# Altium PCB 24V-70A-Power-Board-v2.0.PcbDoc (part 9 of 9)
Units mm, origin at the board's own origin, x right, y up, seen from the top; angles counter-clockwise.
Board outline 350 x 215 mm, 2 copper layers (Top Layer, Bottom Layer), stack 1.64 mm thick; 337 components, 182 nets, 856 pads, 561 vias.
Unrouted connection lines stored in the file: 58.
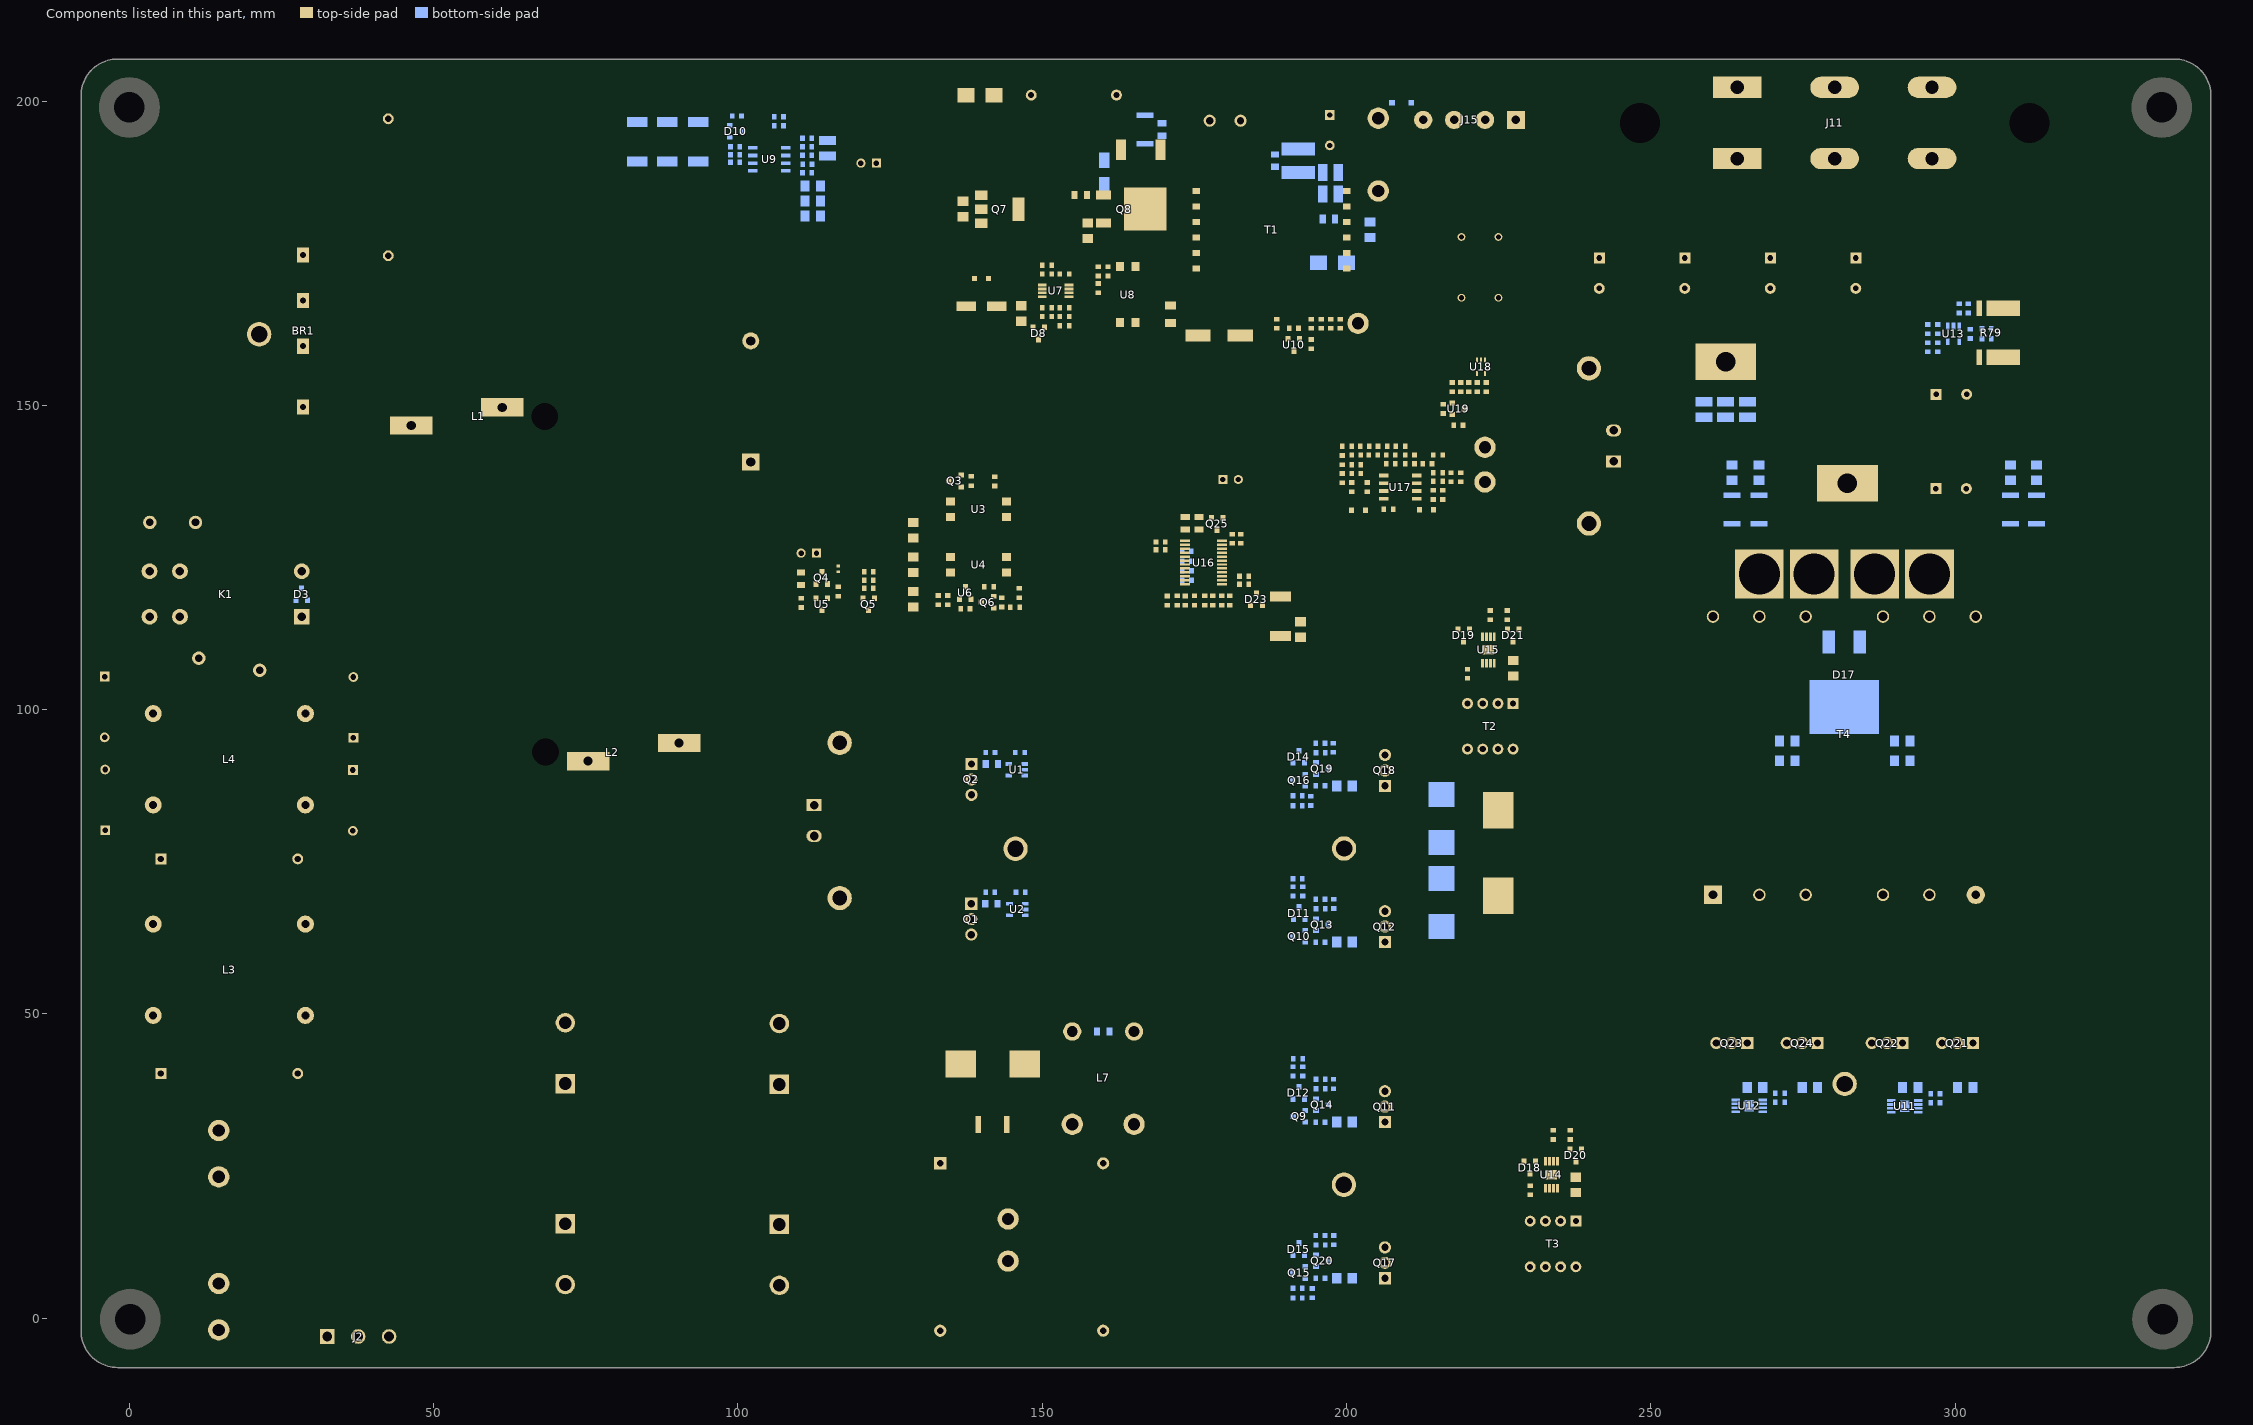
[diagram p4: the components of this part, seen from the top]

## Polygon pours and split planes (outlines as drawn) (continued)
GND on Bottom Layer "GND_L02_P068" (solid, pour order 68): 180.365,201.501 cw(c181.074,201.501) 181.074,202.209 185.748,202.209 cw(c185.762,201.358) 186.614,201.371 186.614,177.876 cw(c185.42,177.876) 185.42,176.682 ccw(c185.42,175.819) 184.556,175.819 184.556,171.247 ccw(c186.334,171.247) 186.334,169.469 220.015,169.469 cw(c220.015,168.427) 221.056,168.427 221.056,167.157 cw(c220.04,167.157) 220.04,166.141 191.694,166.141 ccw(c191.694,163.601) 189.154,163.601 189.154,158.953 cw(c187.173,158.953) 187.173,156.972 179.527,156.972 cw(c179.527,158.521) 177.978,158.521 177.978,159.029 ccw(c175.438,159.029) 175.438,161.569 166.141,161.569 ccw(c166.141,159.029) 163.601,159.029 163.601,111.455 ccw(c166.141,111.455) 166.141,108.915 185.725,108.915 cw(c185.725,106.375) 188.265,106.375 188.265,2.896 ccw(c189.459,2.896) 189.459,1.702 191.182,1.702 ccw(c191.182,2.88) 192.361,2.88 192.361,3.769 cw(c192.681,3.769) 192.681,4.089 208.509,4.089 ccw(c208.509,4.953) 209.372,4.953 209.372,9.347 ccw(c208.197,9.347) 208.197,10.522 201.077,10.522 cw(c201.077,11.396) 200.203,11.396 200.203,12.074 ccw(c199.123,12.074) 199.123,13.154 196.1,13.154 196.1,14.043 219.604,14.043 cw(c219.604,11.503) 222.144,11.503 222.144,8.748 ccw(c224.684,8.748) 224.684,6.208 230.308,6.208 ccw(c230.308,7.04) 231.14,7.04 231.14,9.601 cw(c231.788,9.601) 231.788,10.249 233.326,10.249 cw(c233.326,9.022) 234.553,9.022 234.553,-4.826 cw(c232.013,-4.826) 232.013,-7.366 162.941,-7.366 cw(c162.941,-4.826) 160.401,-4.826 160.401,22.2 170.764,22.2 ccw(c170.764,24.74) 173.304,24.74 173.304,48.819 ccw(c170.764,48.819) 170.764,51.359 145.796,51.359 cw(c145.796,53.238) 143.916,53.238 143.916,62.078 153.543,62.078 ccw(c153.543,64.618) 156.083,64.618 156.083,151.308 ccw(c153.543,151.308) 153.543,153.848 122.326,153.848 cw(c122.326,156.388) 119.786,156.388 119.786,183.769 cw(c121.818,183.769) 121.818,185.801 122.936,185.801 ccw(c122.936,188.341) 125.476,188.341 125.476,199.263 155.457,199.263 cw(c155.457,197.664) 157.056,197.664 157.056,176.809 ccw(c157.767,176.809) 157.767,176.098 171.12,176.098 ccw(c171.12,177.038) 172.06,177.038 172.06,188.798 cw(c173.025,188.798) 173.025,189.763 179.654,189.763 ccw(c179.654,190.475) 180.365,190.475
NetD17_1 on Bottom Layer "NETD17_1_L02_P067" (solid, pour order 67): 264.89,46.958 ccw(c264.89,46.417) 264.349,46.417 264.349,40.909 cw(c263.371,40.912) 263.368,39.935 cw(c263.245,41.182) 263.245,39.929 257.404,39.929 cw(c257.404,41.32) 256.012,41.32 256.012,57.794 ccw(c254.241,57.794) 254.241,59.565 246.075,59.565 236.88,59.565 cw(c236.88,62.105) 234.34,62.105 234.34,124.333 cw(c235.861,124.336) 235.858,125.857 243.205,125.857 ccw(c243.205,127.254) 244.602,127.254 244.602,132.014 cw(c246.541,132.014) 246.541,133.953 269.316,133.953 cw(c269.316,131.413) 271.856,131.413 271.856,117.526 ccw(c273.177,117.526) 273.177,116.205 280.035,116.205 cw(c280.035,115.037) 281.203,115.037 281.203,108.941 cw(c279.984,108.941) 279.984,107.721 270.329,107.721 ccw(c270.329,106.379) 268.986,106.379 268.986,89.535 ccw(c271.526,89.535) 271.526,86.995 279.628,86.995 cw(c279.628,85.725) 280.898,85.725 280.898,56.876 280.898,49.784 cw(c278.358,49.784) 278.358,47.244 276.86,47.244 ccw(c276.86,46.482) 276.098,46.482 276.098,40.818 cw(c275.387,40.818) 275.387,40.107 269.164,40.107 cw(c269.164,41.351) 267.919,41.351 267.919,46.431 ccw(c267.392,46.431) 267.392,46.958
NetD13_1 on Bottom Layer "NETD13_1_L02_P061" (solid, pour order 61): 218.948,68.25 218.948,29.337 cw(c217.703,29.337) 217.703,28.092 209.931,28.092 cw(c209.931,29.362) 208.661,29.362 208.661,32.693 ccw(c207.609,32.693) 207.609,33.745 204.8,33.745 204.8,35.777 208.294,35.777 ccw(c208.294,36.932) 209.448,36.932 209.448,62.179 ccw(c208.407,62.179) 208.407,63.221 204.699,63.221 204.699,65.43 208.407,65.43 ccw(c208.407,66.472) 209.448,66.472 209.448,68.25
GND on Bottom Layer "GND_L02_P057" (solid, pour order 57): 134.854,141.72 ccw(c132.938,141.72) 132.938,143.637 121.26,143.637 ccw(c121.234,141.351) 118.948,141.376 118.948,129.794 ccw(c121.437,129.794) 121.437,127.305 133.829,127.305 cw(c133.829,125.091) 136.042,125.091 136.042,112.42 cw(c133.502,112.42) 133.502,109.88 113.132,109.88 ccw(c113.132,107.34) 110.592,107.34 110.592,91.059 ccw(c112.293,91.059) 112.293,89.357 119.075,89.357 ccw(c119.075,91.237) 120.955,91.237 120.955,93.548 cw(c122.301,93.548) 122.301,94.894 141.732,94.894 141.732,92.523 145.21,92.523 145.21,89.838 142.382,89.838 ccw(c142.382,89.188) 141.732,89.188 141.732,87.788 cw(c141.092,87.788) 141.092,87.148 138.38,87.148 ccw(c138.379,85.75) 136.982,85.75 136.982,72.492 ccw(c138.481,72.492) 138.481,70.993 141.301,70.993 cw(c141.301,70.45) 141.844,70.45 141.844,69.561 144.609,69.561 cw(c144.609,68.675) 145.496,68.675 145.496,67.755 cw(c144.617,67.755) 144.617,66.876 142.138,66.876 ccw(c142.138,66.201) 141.463,66.201 141.463,64.872 cw(c140.637,64.872) 140.637,64.046 83.82,64.046 70.752,64.046 ccw(c70.752,58.979) 65.684,58.979 65.684,-3.023 ccw(c70.028,-3.023) 70.028,-7.366 75.87,-7.366 163.728,-7.366 ccw(c163.728,-4.826) 166.268,-4.826 166.268,19.685 ccw(c163.728,19.685) 163.728,22.225 148.666,22.225 cw(c148.666,24.765) 146.126,24.765 146.126,66.335 cw(c146.667,66.335) 146.667,66.876 147.767,66.876 147.767,67.476 146.667,67.476 cw(c146.667,67.688) 146.455,67.688 146.455,74.141 cw(c148.488,74.141) 148.488,76.175 ccw(c148.488,77.648) 149.962,77.648 149.962,86.309 ccw(c148.387,86.309) 148.387,87.884 147.108,87.884 cw(c147.108,88.639) 146.353,88.639 146.353,89.626 cw(c146.565,89.626) 146.565,89.838 147.665,89.838 147.665,90.438 146.565,90.438 cw(c146.565,90.904) 146.099,90.904 146.099,136.119 ccw(c144.249,136.119) 144.249,137.968 136.207,137.968 cw(c136.207,139.321) 134.854,139.321
NetD2_2 on Bottom Layer "NETD2_2_L02_P040" (solid, pour order 40): 140.274,65.023 cw(c139.804,65.023) 139.804,64.554 127.318,64.554 cw(c127.318,65.989) 125.882,65.989 125.882,71.044 ccw(c123.901,71.044) 123.901,73.025 118.974,73.025 86.538,73.025 cw(c86.538,75.565) 83.998,75.565 83.998,99.39 cw(c86.157,99.39) 86.157,101.549 94.107,101.549 cw(c94.107,99.009) 96.647,99.009 96.647,84.226 ccw(c99.187,84.226) 99.187,81.686 115.418,81.686 123.825,81.686 ccw(c123.825,84.226) 126.365,84.226 126.365,88.036 cw(c127.901,88.036) 127.901,89.573 139.812,89.573 cw(c139.812,88.659) 140.726,88.659 140.726,88.25 cw(c139.992,88.25) 139.992,87.516 137.755,87.516 ccw(c137.755,83.949) 134.188,83.949 134.188,69.556 ccw(c137.126,69.556) 137.126,66.618 139.857,66.618 cw(c139.857,66.201) 140.274,66.201
GND on Bottom Layer "GND_L02_P039" (solid, pour order 39): 80.504,168.06 ccw(c82.626,168.06) 82.626,165.938 101.118,165.938 ccw(c101.118,168.478) 103.658,168.478 103.658,181.941 103.658,188.442 ccw(c103.256,188.442) 103.256,188.844 101.814,188.844 99.815,188.844 cw(c99.815,189.337) 99.322,189.337 99.322,194.242 ccw(c98.873,194.242) 98.873,194.691 97.648,194.691 ccw(c97.648,194.071) 97.028,194.071 97.028,192.831 cw(c96.283,192.831) 96.283,192.086 82.296,192.086 ccw(c82.296,190.294) 80.504,190.294
ISENSE_FB on Bottom Layer "NONET_L-01_P-001" (solid, pour order 18): 99.605,199.609 ccw(c98.216,199.609) 98.216,200.998 17.678,200.998 ccw(c17.678,198.458) 15.138,198.458 15.138,195.021 15.138,175.555 ccw(c18.059,175.555) 18.059,172.634 29.283,172.634 ccw(c29.283,175.174) 31.823,175.174 31.823,176.932 31.823,178.562 cw(c34.363,178.562) 34.363,181.102 54.356,181.102 76.622,181.102 ccw(c76.622,183.642) 79.162,183.642 79.162,190.475 cw(c81.702,190.475) 81.702,193.015 95.758,193.015 ccw(c95.758,193.777) 96.52,193.777 96.52,197.028 99.605,197.028
NetC7_1 on Bottom Layer "NETC7_1_L02_P033" (solid, pour order 33): 13.233,59.207 13.233,53.01 19.406,53.01 19.406,40.475 19.406,23.089 cw(c16.866,23.089) 16.866,20.549 -4.47,20.549 cw(c-4.47,23.089) -7.01,23.089 -7.01,56.667 cw(c-4.47,56.667) -4.47,59.207
AC_N on Bottom Layer "NONET_L-01_P-001" (solid, pour order 34): 55.474,19.157 55.474,56.667 ccw(c52.934,56.667) 52.934,59.207 28.778,59.207 ccw(c28.778,56.667) 26.238,56.667 26.238,26.111 ccw(c28.778,26.111) 28.778,23.571 37.176,23.571 cw(c37.176,21.031) 39.716,21.031 39.716,-5.439 ccw(c41.643,-5.439) 41.643,-7.366 53.594,-7.366 ccw(c53.594,-5.486) 55.474,-5.486 55.474,-3.596
EARTH on Bottom Layer "NONET_L-01_P-001" (solid, pour order 14): 33.553,19.38 cw(c33.553,16.84) 36.093,16.84 36.093,11.43 36.093,-4.597 38.84,-4.597 38.84,22.2 24.511,22.2 24.511,58.877 18.922,58.877 18.922,87.087 cw(c20.532,87.087) 20.532,88.697 38.903,88.697 ccw(c38.904,90.538) 40.745,90.538 40.745,94.539 ccw(c38.84,94.539) 38.84,96.444 -5.567,96.444 ccw(c-5.567,94.623) -7.388,94.623 -7.388,90.404 ccw(c-5.681,90.404) -5.681,88.697 3.346,88.697 14.08,88.697 cw(c14.08,86.376) 16.401,86.376 16.401,73.481 16.401,55.702 21.187,55.702 21.187,19.38
AC_L on Bottom Layer "NONET_L-01_P-001" (solid, pour order 3): 14.691,18.201 32.258,18.201 cw(c32.258,15.661) 34.798,15.661 34.798,-4.826 cw(c32.258,-4.826) 32.258,-7.366 19.615,-7.366 10.185,-7.366 cw(c10.185,-4.826) 7.645,-4.826 7.645,5.131 ccw(c5.105,5.131) 5.105,7.671 -4.47,7.671 cw(c-4.47,10.211) -7.01,10.211 -7.01,15.661 cw(c-4.47,15.661) -4.47,18.201
NetL9_1 on Bottom Layer "NONET_L-01_P-001" (solid, pour order 26): 272.856,141.665 cw(c274.447,141.665) 274.447,143.256 289.179,143.256 cw(c289.225,141.686) 290.796,141.732 290.796,117.412 272.856,117.412
NetC1_2 on Bottom Layer "NONET_L-01_P-001" (solid, pour order 13): 23.622,86.3 ccw(c23.622,83.76) 21.082,83.76 21.082,65.143 ccw(c23.622,65.143) 23.622,62.603 40.172,62.603 ccw(c40.179,64.71) 42.287,64.71 42.287,83.506 ccw(c39.493,83.506) 39.493,86.3
NetC8_1 on Bottom Layer "NONET_L-01_P-001" (solid, pour order 12): 11.913,86.3 cw(c11.913,83.125) 15.088,83.125 15.088,65.143 cw(c12.548,65.143) 12.548,62.603 0.864,62.603 -4.903,62.603 cw(c-4.903,64.71) -7.01,64.71 -7.01,83.506 cw(c-4.216,83.506) -4.216,86.3

## Other copper
Top Layer:
  rectangle net EARTH: 260.22,188.818 268.22,204.018
  rectangle net GND-S: 223.208,115.751 228.446,116.795
  rectangle net GND-S: 227.932,112.624 230.734,113.847
  rectangle net GND-S: 218.979,111.967 220.624,112.59
  rectangle net GND-S: 219.804,111.967 220.624,113.676
  rectangle net GND-S: 220.743,109.034 225.933,110.604
  rectangle net GND-S: 238.229,27.308 240.182,32.385
  rectangle net GND-S: 233.567,30.521 240.182,32.385
  rectangle net GND-S: 231.102,22.783 236.291,24.353
  rectangle net GND-S: 231.122,23.043 232.131,26.228
  rectangle net GND-S: 230.666,25.308 232.131,26.228
  rectangle net NetC73_2: 236.347,136.982 253.086,141.783
  rectangle net NetC73_2: 244.856,102.337 253.086,141.783
  rectangle net NetC73_2: 244.856,102.337 301.466,105.766
  rectangle net NetL9_1: 263.856,128.143 290.796,140.716
  rectangle net NetL9_1: 272.856,117.145 290.796,140.716
  rectangle net NetD13_2: 244.678,47.828 254,72.898
  rectangle net NetD13_2: 244.678,60.579 261.894,72.898
  rectangle net NetD13_2: 217.246,47.828 231.242,74.309
  rectangle net NetR91_2: 216.726,136.977 219.256,137.815
  rectangle net NetR90_2: 215.43,138.514 217.719,139.403
  rectangle net I_out: 198.869,135.641 199.758,137.668
  region net +3V45: 224.702,153.391 224.702,155.688 222.529,155.688 222.529,153.391
  region net +5Vref: 217.919,149.598 217.919,152.629 215.427,152.629 215.427,149.598
  region net NetR114_1: 218.005,146.332 218.005,149.062 215.427,149.062 215.427,146.332
  rectangle net NetC96_1: 200.393,132.366 201.238,136.241
  rectangle net NetC96_2: 201.93,136.911 203.835,137.719
  rectangle net GND-S: 207.295,132.499 208.42,133.731
  rectangle net GND-S: 210.764,138.181 212.909,142.358
  rectangle net GND-S: 207.658,132.499 208.42,142.298
  rectangle net NetC87_1: 213.881,132.379 214.706,134.984
  rectangle net NetC87_1: 210.764,134.163 216.268,134.971
  rectangle net NetC90_1: 215.379,135.687 216.268,137.955
  rectangle net NetC87_2: 213.671,135.641 214.801,142.358
  rectangle net NetC87_2: 210.764,135.641 214.801,136.449
  rectangle net NetC95_2: 209.264,136.911 212.314,137.511
  rectangle net NetC95_2: 209.264,136.911 210.026,143.726
  rectangle net NetR106_1: 206.208,142.837 208.502,143.726
  rectangle net NetC102_2: 204.775,138.181 206.896,142.298
  rectangle net NetC102_2: 204.775,141.409 206.896,142.298
  rectangle net NetR106_2: 203.388,142.837 205.597,143.726
  rectangle net NetR116_1: 201.981,141.409 204.013,142.298
  rectangle net NetR116_2: 200.457,141.409 201.219,143.726
  rectangle net +5Vref: 201.864,142.837 202.626,143.726
  rectangle net NetR111_2: 198.856,138.366 199.745,140.703
  rectangle net NetR111_2: 198.856,139.814 201.219,140.703
  rectangle net NetC97_2: 200.393,136.957 201.282,139.256
  rectangle net NetC96_2: 201.93,136.911 202.743,140.703
  rectangle net NetC96_2: 201.93,136.911 206.914,137.511
  rectangle net NetC96_1: 200.393,135.433 203.835,136.241
  rectangle net NetC96_1: 200.393,135.641 206.914,136.241
  rectangle net GND-S: 176.562,127.992 181.674,128.624
  rectangle net GND-S: 176.562,122.238 178.047,128.624
  rectangle net NetD5_1: 197.079,170.236 198.514,178.74
  rectangle net NetJ9_1: 200.21,161.59 203.71,165.502
  rectangle net NetD7_2: 150.886,162.272 153.28,163.652
  rectangle net NetD7_2: 149.958,162.272 153.28,163.295
  rectangle net NetC22_2: 146.431,160.363 150.778,161.891
  rectangle net NetC22_2: 145.567,160.363 147.454,164.91
  rectangle net NetC22_2: 145.567,163.674 150.406,164.91
  rectangle net NetC22_2: 149.542,163.674 150.406,165.059
  rectangle net NetC41_2: 208.656,7.874 213.728,10.167
  rectangle net NetC40_2: 208.67,88.969 213.741,91.262
  region net GND: 154.965,175.168 154.131,176.002 152.4,174.271 153.234,173.437
  rectangle net GND: 152.4,171.158 153.28,174.271
  rectangle net GND: 154.127,174.338 166.319,176.002
  rectangle net GND: 156.591,174.338 158.369,178.198
  rectangle net GND-S: 178.711,127.648 180.361,128.473
  rectangle net GND-S: 178.709,127.992 181.674,128.624
  rectangle net GND-S: 180.785,128.473 181.674,130.438
  rectangle net GND-S: 191.567,113.707 193.345,122.357
  rectangle net GND-S: 184.974,120.169 193.345,122.357
  rectangle net GND-S: 183.562,121.468 191.16,122.357
  rectangle net GND-S: 166.929,125.818 169.071,126.707
  rectangle net GND-S: 177.559,115.367 179.981,117.559
  rectangle net GND-S: 173.047,115.367 175.468,117.554
  rectangle net VCC_FB: 180.785,126.949 183.054,127.711
  rectangle net NetC93_2: 172.666,125.813 174.316,126.463
  rectangle net VREF: 172.729,127.608 174.253,130.147
  rectangle net NetR10_1: 145.895,116.109 148.123,117.396
  rectangle net GND-S: 130.861,121.864 133.635,126.205
  rectangle net VCC_Primary: 139.908,137.968 141.084,149.365
  rectangle net NetQ3_1: 136.207,136.227 138.763,137.206
  rectangle net VCC_Primary: 136.207,137.968 141.084,139.37
  rectangle net GND-S: 172.666,131.067 178.198,133.848
  rectangle net NetC13_2: 121.886,117.807 122.855,123.11
  rectangle net PFC_ON: 115.945,123.377 117.012,126.252
  rectangle net VCC_PFC: 132.537,140.056 139.04,147.777
  rectangle net VCC_PFC: 131.953,137.177 135.323,147.777
  rectangle net GND: 139.946,119.725 140.96,121.469
  rectangle net GND: 132.499,119.725 137.869,121.469
  rectangle net GND: 132.499,118.389 134.918,121.234
  rectangle net GND-S: 132.279,124.463 135.703,126.205
  rectangle net NetQ6_3: 139.557,116.109 140.96,118.106
  rectangle net NetQ6_3: 137.706,116.109 140.477,116.998
  rectangle net NetC15_2: 135.703,116.121 137.173,118.645
  rectangle net VCC_Primary: 141.557,117.95 142.398,120.655
  rectangle net NetQ6_1: 141.557,116.109 145.158,117.315
  rectangle net VCC_Primary: 141.557,117.95 154.28,119.056
  rectangle net NetR10_1: 143.403,121.923 146.67,123.223
  rectangle net NetR10_1: 145.723,119.55 148.051,123.223
  rectangle net NetC15_2: 127.914,116.121 137.173,117.645
  rectangle net NetR18_1: 127.914,118.661 129.692,123.313
  rectangle net NetR15_1: 127.914,124.329 129.692,128.981
  rectangle net +390V: 102.972,129.997 129.692,131.521
  rectangle net NetD5_1: 197.079,176.479 205.105,178.74
  region net NetD5_1: 205.105,178.74 202.893,178.74 202.893,170.236 205.105,170.236
  rectangle net NetD5_1: 197.079,170.236 205.105,173.894
  rectangle net GND: 149.298,169.01 153.28,169.314
  rectangle net GND: 151.167,164.17 153.28,172.047
  rectangle net GND-S: 189.814,154.105 195.91,159.791
  rectangle net NetC30_1: 188.074,163.801 194.628,165.502
  rectangle net NetJ9_1: 195.411,163.801 203.71,165.502
  rectangle net NetC26_2: 191.745,160.448 196.342,163.103
  rectangle net NetQ8_1: 156.591,183.687 161.309,185.465
  rectangle net NetQ8_3: 156.591,179.087 161.309,180.865
  rectangle net NetC21_2: 136.117,179.182 140.981,180.682
  rectangle net NetC21_2: 136.117,179.182 137.895,181.68
  rectangle net NetQ7_1: 136.117,182.784 137.895,185.282
  rectangle net NetQ7_1: 136.117,183.782 140.981,185.282
  rectangle net GND-S: 119.04,117.807 121.124,118.894
  rectangle net GND-S: 109.738,115.868 116.923,117.345
  rectangle net GND-S: 120.135,117.868 121.124,121.742
  rectangle net VCC_FB: 116.034,119.802 118.643,121.126
  rectangle net INRUSH_RLY: 112.163,122.031 121.124,123.111
  rectangle net INRUSH_RLY: 112.163,122.031 113.663,126.48
  rectangle net VCC_FB: 109.738,122.031 111.008,126.464
  rectangle net VCC_FB: 116.034,119.802 116.923,121.126
  rectangle net VCC_FB: 114.332,120.206 116.923,121.126
  rectangle net NetQ4_1: 114.332,117.868 116.923,119.04
  rectangle net NetC14_2: 109.738,117.868 111.008,121.015
  rectangle net NetC14_2: 109.84,117.868 113.252,118.788
  rectangle net NetQ4_1: 114.332,117.868 115.152,119.802
  rectangle net NetQ4_1: 112.432,119.148 115.152,119.802
  rectangle net NetQ4_1: 112.432,119.289 113.252,121.126
  rectangle net NetD3_1: 119.527,114.554 123.444,116.788
  pour cut-out: 323.723,57.402 323.723,59.36 ccw(c321.183,59.36) 321.183,61.9 302.641,61.9 cw(c302.641,63.094) 301.447,63.094 301.447,62.158 ccw(c303.788,62.158) 303.788,59.817 321.308,59.817 cw(c321.308,57.402)
  pour cut-out: 301.447,75.59 cw(c303.987,75.59) 303.987,78.13 337.109,78.13 cw(c337.109,75.59) 339.649,75.59 339.649,74.422 ccw(c337.464,74.422) 337.464,76.606 303.987,76.606 ccw(c303.987,74.066) 301.447,74.066 301.447,73.33
  pour cut-out: 321.183,59.817 cw(c321.183,57.277) 323.723,57.277 323.723,28.042 cw(c321.183,28.042) 321.183,25.502 317.678,25.502 ccw(c317.678,27.686) 319.862,27.686 319.862,57.511 ccw(c317.556,57.511) 317.556,59.817
  pour cut-out: 225.969,94.941 227.699,94.941 cw(c227.699,93.523) 229.118,93.523 229.118,91.372 cw(c228.518,91.372) 228.518,90.773 226.836,90.773 cw(c226.836,91.665) 225.944,91.665 225.944,94.835
  pour cut-out: 236.271,9.881 236.271,8.151 ccw(c237.689,8.151) 237.689,6.732 239.84,6.732 ccw(c239.84,7.332) 240.439,7.332 240.439,9.014 ccw(c239.547,9.014) 239.547,9.906 236.377,9.906
  pour cut-out: 204.814,63.111 207.811,63.111 207.811,60.393 204.814,60.393
  pour cut-out: 204.8,33.528 207.797,33.528 207.797,30.81 204.8,30.81
  pour cut-out: 124.771,192.069 124.771,187.751 118.192,187.751 118.192,192.069
Bottom Layer:
  rectangle net GND-S: 271.63,35.039 273.621,38.805
  rectangle net GND-S: 297.157,34.946 299.118,38.805
  rectangle net EARTH: 253.949,188.818 268.22,205.957
  region net NetC73_2: 283.083,106.156 270.135,106.156 270.135,102.54 283.083,102.54
  rectangle net NetC73_2: 282.651,102.54 293.624,106.156
  rectangle net GND-S: 269.95,88.341 271.91,99.568
  rectangle net GND-S: 291.414,88.341 293.373,99.72
  rectangle net GND-S: 290.939,32.791 292.509,36.451
  rectangle net GND-S: 265.412,32.884 266.982,36.544
  rectangle net NetD13_2: 222.123,48.387 253.136,56.134
  rectangle net NetC37_2: 216.332,172.771 227.432,182.651
  region net NetC71_2: 307.718,138.495 307.718,134.829 310.518,134.829 310.518,138.495
  region net NetC72_2: 311.973,138.495 311.973,134.829 314.773,134.829 314.773,138.495
  region net NetC78_2: 266.385,138.495 266.385,134.871 269.185,134.871 269.185,138.495
  region net NetC77_2: 261.94,138.495 261.94,134.829 264.74,134.829 264.74,138.495
  rectangle net NetD13_2: 220.103,48.387 230.759,81.441
  rectangle net NetC73_2: 272.926,88.341 290.833,106.156
  rectangle net VCC_FB: 183.972,128.829 187.376,153.06
  rectangle net VCC_FB: 182.761,128.829 185.471,136.423
  rectangle net VCC_FB: 176.911,134.417 185.471,136.423
  rectangle net VCC_FB: 177.749,148.107 186.487,153.06
  rectangle net VCC_FB: 187.63,190.739 194.996,202.182
  rectangle net NetD25_2: 210.169,195.222 214.274,200.167
  rectangle net NetC17_2: 197.481,179.153 204.876,182.709
  rectangle net VCC_FB: 187.63,195.222 207.969,202.182
  rectangle net NetD13_2: 209.448,68.885 230.759,81.441
  rectangle net GND: 208.61,82.677 218.059,95.352
  rectangle net GND: 200.203,91.568 218.059,95.352
  rectangle net GND: 208.61,82.677 223.672,91.673
  rectangle net GND: 221.132,82.677 223.672,94.844
  rectangle net NetC17_1: 187.579,170.312 196.901,189.804
  rectangle net NetC17_1: 185.953,170.307 195.275,175.539
  rectangle net GND-S: 166.294,128.829 182.228,134.001
  rectangle net GND-S: 166.294,115.214 169.469,140.945
  rectangle net GND-S: 174.136,115.214 180.543,126.457
  rectangle net GND-S: 166.294,115.214 180.543,119.837
  rectangle net GND-S: 174.136,120.472 191.668,126.457
  rectangle net GND-S: 166.294,128.829 176.555,140.945
  rectangle net VCC_Primary: 170.104,148.082 176.428,160.376
  rectangle net VCC_PFC: 146.565,90.788 147.665,93.467
  rectangle net GND: 111.582,59.817 121.844,71.057
  rectangle net GND: 141.732,92.523 146.101,94.894
  rectangle net GND: 136.728,120.346 141.116,122.276
  rectangle net GND-S: 119.559,116.1 132.613,125.955
  rectangle net GND-S: 114.884,116.1 132.613,119.429
  rectangle net +390V: 112.344,157.505 115.815,182.143
  rectangle net GND: 111.76,189.049 112.522,192.93
  rectangle net GND: 111.785,189.049 118.651,191.77
  rectangle net GND: 116.789,189.049 118.651,197.866
  rectangle net GND: 106.934,196.291 118.651,197.866
  rectangle net GND: 106.934,193.37 108.204,197.866
  rectangle net GND: 106.934,193.105 109.677,194.691
  rectangle net NetD5_1: 197.481,170.307 204.876,178.638
  rectangle net NetC16_2: 171.399,191.395 179.553,202.256
  rectangle net NetC16_2: 158.394,195.189 179.553,202.209
  rectangle net NetC16_1: 158.394,188.49 170.485,194.834
  rectangle net NetD6_2: 158.394,176.809 170.485,188.138
  rectangle net NetR75_1: 293.575,35.791 294.275,37.823
  rectangle net NetR76_1: 268.048,35.884 268.748,37.916
  pour cut-out: 34.962,22.2 37.499,22.2 cw(c37.499,20.93) 38.769,20.93 38.769,18.392 38.99,18.392 38.99,21.153 ccw(c37.72,21.153) 37.72,22.423 34.962,22.423
  pour cut-out: 223.868,153.437 230.406,153.437 230.406,155.947 223.868,155.947
  pour cut-out: 295.221,134.781 298.471,134.781 298.471,138.083 295.221,138.083
  pour cut-out: 295.311,150.241 298.561,150.241 298.561,153.543 295.311,153.543
  pour cut-out: 281.98,175.679 281.98,172.657 285.282,172.657 285.282,175.687 281.995,175.687
  pour cut-out: 267.93,175.679 267.93,172.657 271.232,172.657 271.232,175.687 267.945,175.687
  pour cut-out: 253.88,175.679 253.88,172.657 257.182,172.657 257.182,175.687 253.895,175.687
  pour cut-out: 239.83,175.679 239.83,172.657 243.132,172.657 243.132,175.687 239.845,175.687
  pour cut-out: 267.32,160.204 267.32,162.077 286.814,162.077 286.814,160.204
  pour cut-out: 187.909,133.657 203.996,133.657 203.996,130.321 187.909,130.321
  pour cut-out: 170.227,128.549 190.525,128.549 194.611,132.635 194.611,130.12 191.149,126.658 170.227,126.658
  pour cut-out: 130.451,27.973 130.451,22.944 136.065,22.944 136.065,27.973
  pour cut-out: 141.605,11.909 141.605,6.88 147.218,6.88 147.218,11.909
  pour cut-out: 68.834,18.052 68.834,13.023 74.447,13.023 74.447,18.052
  pour cut-out: 104.013,17.925 104.013,12.896 109.626,12.896 109.626,17.925
  pour cut-out: 104.013,40.945 104.013,35.916 109.626,35.916 109.626,40.945
  pour cut-out: 68.834,41.072 68.834,36.043 74.447,36.043 74.447,41.072
Multi-Layer:
  pour cut-out: 68.241,145.237 cw(c68.241,148.225) 65.252,148.225 cw(c68.241,148.225) 68.241,151.214 cw(c68.241,148.225) 71.229,148.225 cw(c68.241,148.225)
  pour cut-out: 68.396,90.052 cw(c68.396,93.041) 65.407,93.041 cw(c68.396,93.041) 68.396,96.029 cw(c68.396,93.041) 71.384,93.041 cw(c68.396,93.041)
  pour cut-out: 21.31,158.716 cw(c21.31,161.704) 18.322,161.704 cw(c21.31,161.704) 21.31,164.692 cw(c21.31,161.704) 24.298,161.704 cw(c21.31,161.704)

## Silkscreen, mask and mechanical layers (free items; w line width, h text height)
Top Overlay:
  lines w0.127: 29.972,2.003 29.972,4.902 45.212,4.902 45.212,2.003 ; 279.878,46.958 283.815,46.958 ; 305.405,43.021 305.405,47.466
  text "VCC-FB" at 206.414,199.689 h1.5 r90
  text "VCC-FB" at 215.634,194.019 h1.5 r180
  text "GND-S" at 225.794,194.019 h1.5 r180
  text "GND-S" at 206.414,187.732 h1.5 r90
  text "EARTH" at 270.341,183.753 h2 r180
  text "V OUT" at 284.79,183.753 h2 r180
  text "V OUT-" at 301.79,183.753 h2 r180
  text "VSENCE" at 120.721,181.198 h1 r90
  text "VCC-PFC" at 123.261,181.145 h1 r90
  text "I-OUT" at 225.497,141.947 h1.5
  text "PG-PFC" at 180.248,140.195 h1 r90
  text "GND-S" at 182.788,140.195 h1 r90
  text "V-OUT" at 225.497,136.239 h1.5
  text "VCC-PFC" at 110.873,127.611 h1 r90
  text "INRUSH RLY" at 113.403,127.611 h1 r90
  text "L" at 32.155,2.828 h1
  text "EARTH" at 35.252,2.828 h1
  text "N" at 42.22,2.828 h1
Bottom Overlay:
  text "EARTH" at 260.981,183.753 h2 r180
  text "V OUT" at 275.649,183.753 h2 r180
  text "V OUT-" at 290.649,183.753 h2 r180
  text "CAUTION: HOT SURFACE" at 338.328,171.31 h2.8
  text "DO NOT TOUCH AREA" at 232.849,56.923 h4 r270
  text "DO NOT TOUCH AREA" at 326.803,56.923 h4 r270
  text "CAUTION: HOT SURFACE" at 338.328,15.101 h2.8
Bottom Solder:
  region: 266.705,106.666 240.543,106.666 240.543,100.457 266.705,100.457
  rectangle: 296.926,100.457 323.088,106.666
  region: 252.354,113.016 240.543,113.016 240.543,60.96 252.354,60.96
  region: 279.278,66.167 259.466,66.167 259.466,49.276 279.278,49.276
  region: 279.278,81.153 240.543,81.153 240.543,75.946 279.278,75.946
  region: 279.278,66.167 240.543,66.167 240.543,60.96 279.278,60.96
  rectangle: 284.353,60.96 323.088,66.167
  rectangle: 284.353,75.946 323.088,81.153
  rectangle: 284.353,49.276 304.165,66.167
  rectangle: 311.277,60.96 323.088,113.016
Board Outline:
  lines w0.127: 14.199,171.094 31.648,171.094 31.648,171.894 14.199,171.894 14.199,171.094 ; 22.936,152.281 22.936,153.081 31.648,153.081 31.648,152.281 22.936,152.281 ; 33.482,152.281 34.282,152.281 34.282,163.853 33.482,163.853 33.482,152.281
  lines w0.254: -7.942,-2.091 ccw(c-1.942,-2.091) -1.942,-8.091 336.058,-8.091 ccw(c336.058,-2.091) 342.058,-2.091 342.058,200.909 ccw(c336.058,200.909) 336.058,206.909 -1.942,206.909 ccw(c-1.942,200.909) -7.942,200.909 -7.942,-2.091 ; 24.765,111.785 26.035,111.785 26.035,126.263 24.765,126.263 24.765,111.785 ; 57.658,6.452 59.99,6.452 59.99,48.113 57.658,48.113 57.658,6.452
Fabrication:
  drawing of 191 lines, arcs and shapes, not listed
  text "Layer" at 352.901,203.251 h1.52
  text "Name" at 363.313,203.251 h1.52
  text "Material" at 386.928,203.251 h1.52
  text "Thickness" at 408.766,203.251 h1.52
  text "Constant" at 425.272,203.251 h1.52
  text "Board Layer Stack" at 439.747,203.251 h1.52
  text "Top Overlay" at 363.313,200.203 h1.52
  text "Top Solder" at 363.313,197.155 h1.52
  text "Solder Resist" at 386.928,197.155 h1.52
  text "0.010mm" at 408.766,197.155 h1.52
  text "3.5" at 425.272,197.155 h1.52
  text "1" at 352.901,194.107 h1.52
  text "Top Layer" at 363.313,194.107 h1.52
  text "0.070mm" at 408.766,194.107 h1.52
  text "Dielectric 1" at 363.313,191.059 h1.52
  text "FR-4" at 386.928,191.059 h1.52
  text "1.500mm" at 408.766,191.059 h1.52
  text "4.6" at 425.272,191.059 h1.52
  text "2" at 352.901,188.011 h1.52
  text "Bottom Layer" at 363.313,188.011 h1.52
  text "0.070mm" at 408.766,188.011 h1.52
  text "Bottom Solder" at 363.313,184.963 h1.52
  text "Solder Resist" at 386.928,184.963 h1.52
  text "0.010mm" at 408.766,184.963 h1.52
  text "3.5" at 425.272,184.963 h1.52
  text "Bottom Overlay" at 363.313,181.915 h1.52
  text "Total board thickness:" at 352.901,178.867 h1.52
  text "1.660mm" at 408.766,178.867 h1.52
  text "Fabrication Notes:" at 350.407,132.166 h20
  text "Copper Weight: 2 Oz / Some Vias are tented, please fabricate the vias as in the design." at 349.352,14.236 h12
Drill Drawing:
  drawing of 191 lines, arcs and shapes, not listed
  text "Symbol" at -4.28,349.782 h1.83
  text "Count" at 8.569,349.782 h1.83
  text "Hole Size" at 23.805,349.782 h1.83
  text "Plated" at 53.261,349.782 h1.83
  text "Hole Type" at 66.11,349.782 h1.83
  text "Drill Layer Pair" at 84.749,349.782 h1.83
  text "Via/Pad" at 122.837,349.782 h1.83
  text "Pad Shape" at 137.819,349.782 h1.83
  text "Template" at 156.763,349.782 h1.83
  text "Description" at 192.312,349.782 h1.83
  text "Hole Tolerance (+)" at 213.998,349.782 h1.83
  text "Hole Tolerance (-)" at 247.871,349.782 h1.83
  text "Hole Length" at 281.745,349.782 h1.83
  text "Routed Path Length" at 311.2,349.782 h1.83
  text "2" at 8.569,345.972 h1.52
  text "1.118mm (44.00mil)" at 23.805,345.972 h1.52
  text "PTH" at 53.261,345.972 h1.52
  text "Round" at 66.11,345.972 h1.52
  text "Top Layer - Bottom Layer" at 84.749,345.972 h1.52
  text "Pad" at 122.837,345.972 h1.52
  text "(Mixed)" at 137.819,345.972 h1.52
  text "(Mixed)" at 156.763,345.972 h1.52
  text "-" at 281.745,345.972 h1.52
  text "-" at 311.2,345.972 h1.52
  text "I" at -4.737,345.718 h1.69
  text "2" at 8.569,342.162 h1.52
  text "1.200mm (47.24mil)" at 23.805,342.162 h1.52
  text "PTH" at 53.261,342.162 h1.52
  text "Round" at 66.11,342.162 h1.52
  text "Top Layer - Bottom Layer" at 84.749,342.162 h1.52
  text "Pad" at 122.837,342.162 h1.52
  text "Rounded" at 137.819,342.162 h1.52
  text "c200h120o0_0m0mx0" at 156.763,342.162 h1.52
  text "-" at 281.745,342.162 h1.52
  text "-" at 311.2,342.162 h1.52
  text "H" at -5.019,341.908 h1.69
  text "2" at 8.569,338.352 h1.52
  text "1.500mm (59.06mil)" at 23.805,338.352 h1.52
  text "PTH" at 53.261,338.352 h1.52
  text "Round" at 66.11,338.352 h1.52
  text "Top Layer - Bottom Layer" at 84.749,338.352 h1.52
  text "Pad" at 122.837,338.352 h1.52
  text "(Mixed)" at 137.819,338.352 h1.52
  text "(Mixed)" at 156.763,338.352 h1.52
  text "-" at 281.745,338.352 h1.52
  text "-" at 311.2,338.352 h1.52
  text "2" at 8.569,334.542 h1.52
  text "1.760mm (69.29mil)" at 23.805,334.542 h1.52
  text "PTH" at 53.261,334.542 h1.52
  text "Round" at 66.11,334.542 h1.52
  text "Top Layer - Bottom Layer" at 84.749,334.542 h1.52
  text "Pad" at 122.837,334.542 h1.52
  text "Rounded" at 137.819,334.542 h1.52
  text "c300h176m0mx0" at 156.763,334.542 h1.52
  text "-" at 281.745,334.542 h1.52
  text "-" at 311.2,334.542 h1.52
  text "2" at 8.569,330.732 h1.52
  text "2.010mm (79.13mil)" at 23.805,330.732 h1.52
  text "PTH" at 53.261,330.732 h1.52
  text "Round" at 66.11,330.732 h1.52
  text "Top Layer - Bottom Layer" at 84.749,330.732 h1.52
  text "Pad" at 122.837,330.732 h1.52
  text "Rounded" at 137.819,330.732 h1.52
  text "c350h201m0mx0" at 156.763,330.732 h1.52
  text "-" at 281.745,330.732 h1.52
  text "-" at 311.2,330.732 h1.52
  text "2" at 8.569,326.922 h1.52
  text "3.200mm (125.98mil)" at 23.805,326.922 h1.52
  text "PTH" at 53.261,326.922 h1.52
  text "Rectangle" at 66.11,326.922 h1.52
  text "Top Layer - Bottom Layer" at 84.749,326.922 h1.52
  text "Pad" at 122.837,326.922 h1.52
  text "Rectangle" at 137.819,326.922 h1.52
  text "r1000_600h320_700m0mx0" at 156.763,326.922 h1.52
  text "7.000mm (275.59mil)" at 281.745,326.922 h1.52
  text "7.000mm (275.59mil)" at 311.2,326.922 h1.52
  text "2" at 8.569,323.112 h1.52
  text "4.400mm (173.23mil)" at 23.805,323.112 h1.52
  text "NPTH" at 53.261,323.112 h1.52
  text "Round" at 66.11,323.112 h1.52
  text "Top Layer - Bottom Layer" at 84.749,323.112 h1.52
  text "Pad" at 122.837,323.112 h1.52
  text "Rounded" at 137.819,323.112 h1.52
  text "c0hn440m0mx0" at 156.763,323.112 h1.52
  text "-" at 281.745,323.112 h1.52
  text "-" at 311.2,323.112 h1.52
  text "A" at -5.019,322.858 h1.69
  text "2" at 8.569,319.302 h1.52
  text "6.600mm (259.84mil)" at 23.805,319.302 h1.52
  text "NPTH" at 53.261,319.302 h1.52
  text "Round" at 66.11,319.302 h1.52
  text "Top Layer - Bottom Layer" at 84.749,319.302 h1.52
  text "Pad" at 122.837,319.302 h1.52
  text "Rounded" at 137.819,319.302 h1.52
  text "c0hn660m0mx0" at 156.763,319.302 h1.52
  text "-" at 281.745,319.302 h1.52
  text "-" at 311.2,319.302 h1.52
  text "3" at 8.569,315.492 h1.52
  text "1.600mm (62.99mil)" at 23.805,315.492 h1.52
  text "PTH" at 53.261,315.492 h1.52
  text "Round" at 66.11,315.492 h1.52
  text "Top Layer - Bottom Layer" at 84.749,315.492 h1.52
  text "Pad" at 122.837,315.492 h1.52
  text "(Mixed)" at 137.819,315.492 h1.52
  text "(Mixed)" at 156.763,315.492 h1.52
  text "-" at 281.745,315.492 h1.52
  text "-" at 311.2,315.492 h1.52
  text "C" at -5.019,315.238 h1.69
  text "4" at 8.569,311.682 h1.52
  text "1.000mm (39.37mil)" at 23.805,311.682 h1.52
  text "PTH" at 53.261,311.682 h1.52
  text "Slot" at 66.11,311.682 h1.52
  text "Top Layer - Bottom Layer" at 84.749,311.682 h1.52
  text "Pad" at 122.837,311.682 h1.52
  text "Rectangle" at 137.819,311.682 h1.52
  text "r250_200h100_137m0mx0" at 156.763,311.682 h1.52
  text "1.370mm (53.94mil)" at 281.745,311.682 h1.52
  text "0.370mm (14.57mil)" at 311.2,311.682 h1.52
  text "D" at -5.019,311.428 h1.69
  text "4" at 8.569,307.872 h1.52
  text "1.250mm (49.21mil)" at 23.805,307.872 h1.52
  text "PTH" at 53.261,307.872 h1.52
  text "Round" at 66.11,307.872 h1.52
  text "Top Layer - Bottom Layer" at 84.749,307.872 h1.52
  text "Pad" at 122.837,307.872 h1.52
  text "Rounded" at 137.819,307.872 h1.52
  text "c220h125m0mx0" at 156.763,307.872 h1.52
  text "-" at 281.745,307.872 h1.52
  text "-" at 311.2,307.872 h1.52
  text "G" at -5.019,307.618 h1.69
  text "4" at 8.569,304.062 h1.52
  text "1.500mm (59.06mil)" at 23.805,304.062 h1.52
  text "PTH" at 53.261,304.062 h1.52
  text "Rectangle" at 66.11,304.062 h1.52
  text "Top Layer - Bottom Layer" at 84.749,304.062 h1.52
  text "Pad" at 122.837,304.062 h1.52
  text "Rectangle" at 137.819,304.062 h1.52
  text "r700_300h150_550m0mx0" at 156.763,304.062 h1.52
  text "5.500mm (216.54mil)" at 281.745,304.062 h1.52
  text "5.500mm (216.54mil)" at 311.2,304.062 h1.52
  text "B" at -5.019,303.808 h1.69
  text "4" at 8.569,300.252 h1.52
  text "2.400mm (94.49mil)" at 23.805,300.252 h1.52
  text "PTH" at 53.261,300.252 h1.52
  text "Round" at 66.11,300.252 h1.52
  text "Top Layer - Bottom Layer" at 84.749,300.252 h1.52
  text "Pad" at 122.837,300.252 h1.52
  text "Rounded" at 137.819,300.252 h1.52
  text "c400h240m420mx420p0" at 156.763,300.252 h1.52
  text "-" at 281.745,300.252 h1.52
  text "-" at 311.2,300.252 h1.52
  text "L" at -5.019,299.998 h1.69
  text "4" at 8.569,296.442 h1.52
  text "5.000mm (196.85mil)" at 23.805,296.442 h1.52
  text "PTH" at 53.261,296.442 h1.52
  text "Round" at 66.11,296.442 h1.52
  text "Top Layer - Bottom Layer" at 84.749,296.442 h1.52
  text "Pad" at 122.837,296.442 h1.52
  text "Rounded" at 137.819,296.442 h1.52
  text "c1000h500m0mx0" at 156.763,296.442 h1.52
  text "-" at 281.745,296.442 h1.52
  text "-" at 311.2,296.442 h1.52
  text "M" at -5.019,296.188 h1.69
  text "4" at 8.569,292.632 h1.52
  text "6.750mm (265.75mil)" at 23.805,292.632 h1.52
  text "PTH" at 53.261,292.632 h1.52
  text "Round" at 66.11,292.632 h1.52
  text "Top Layer - Bottom Layer" at 84.749,292.632 h1.52
  text "Pad" at 122.837,292.632 h1.52
  text "Rectangle" at 137.819,292.632 h1.52
  text "s800h675m0mx0" at 156.763,292.632 h1.52
  text "-" at 281.745,292.632 h1.52
  text "-" at 311.2,292.632 h1.52
  text "5" at 8.569,288.822 h1.52
  text "2.700mm (106.30mil)" at 23.805,288.822 h1.52
  text "PTH" at 53.261,288.822 h1.52
  text "Round" at 66.11,288.822 h1.52
  text "Top Layer - Bottom Layer" at 84.749,288.822 h1.52
  text "Pad" at 122.837,288.822 h1.52
  text "Rounded" at 137.819,288.822 h1.52
  text "c400h270m0mx0" at 156.763,288.822 h1.52
  text "-" at 281.745,288.822 h1.52
  text "-" at 311.2,288.822 h1.52
  text "K" at -5.019,288.568 h1.69
  text "6" at 8.569,285.012 h1.52
  text "0.850mm (33.47mil)" at 23.805,285.012 h1.52
  text "PTH" at 53.261,285.012 h1.52
  text "Round" at 66.11,285.012 h1.52
  text "Top Layer - Bottom Layer" at 84.749,285.012 h1.52
  text "Pad" at 122.837,285.012 h1.52
  text "(Mixed)" at 137.819,285.012 h1.52
  text "(Mixed)" at 156.763,285.012 h1.52
  text "-" at 281.745,285.012 h1.52
  text "-" at 311.2,285.012 h1.52
  text "6" at 8.569,281.202 h1.52
  text "0.900mm (35.43mil)" at 23.805,281.202 h1.52
  text "PTH" at 53.261,281.202 h1.52
  text "Round" at 66.11,281.202 h1.52
  text "Top Layer - Bottom Layer" at 84.749,281.202 h1.52
  text "Pad" at 122.837,281.202 h1.52
  text "(Mixed)" at 137.819,281.202 h1.52
  text "(Mixed)" at 156.763,281.202 h1.52
  text "-" at 281.745,281.202 h1.52
  text "-" at 311.2,281.202 h1.52
  text "J" at -5.019,280.948 h1.69
  text "6" at 8.569,277.392 h1.52
  text "2.200mm (86.61mil)" at 23.805,277.392 h1.52
  text "PTH" at 53.261,277.392 h1.52
  text "Slot" at 66.11,277.392 h1.52
  text "Top Layer - Bottom Layer" at 84.749,277.392 h1.52
  text "Pad" at 122.837,277.392 h1.52
  text "(Mixed)" at 137.819,277.392 h1.52
  text "(Mixed)" at 156.763,277.392 h1.52
  text "5.700mm (224.41mil)" at 281.745,277.392 h1.52
  text "3.500mm (137.79mil)" at 311.2,277.392 h1.52
  text "8" at 8.569,273.582 h1.52
  text "1.050mm (41.34mil)" at 23.805,273.582 h1.52
  text "PTH" at 53.261,273.582 h1.52
  text "Round" at 66.11,273.582 h1.52
  text "Top Layer - Bottom Layer" at 84.749,273.582 h1.52
  text "Pad" at 122.837,273.582 h1.52
  text "(Mixed)" at 137.819,273.582 h1.52
  text "(Mixed)" at 156.763,273.582 h1.52
  text "-" at 281.745,273.582 h1.52
  text "-" at 311.2,273.582 h1.52
  text "8" at 8.569,269.772 h1.52
  text "1.320mm (51.97mil)" at 23.805,269.772 h1.52
  text "PTH" at 53.261,269.772 h1.52
  text "Round" at 66.11,269.772 h1.52
  text "Top Layer - Bottom Layer" at 84.749,269.772 h1.52
  text "Pad" at 122.837,269.772 h1.52
  text "Rounded" at 137.819,269.772 h1.52
  text "c280h132m0mx0" at 156.763,269.772 h1.52
  text "-" at 281.745,269.772 h1.52
  text "-" at 311.2,269.772 h1.52
  text "E" at -5.019,269.518 h1.69
  text "8" at 8.569,265.962 h1.52
  text "2.100mm (82.68mil)" at 23.805,265.962 h1.52
  text "PTH" at 53.261,265.962 h1.52
  text "Round" at 66.11,265.962 h1.52
  text "Top Layer - Bottom Layer" at 84.749,265.962 h1.52
  text "Pad" at 122.837,265.962 h1.52
  text "(Mixed)" at 137.819,265.962 h1.52
  text "(Mixed)" at 156.763,265.962 h1.52
  text "-" at 281.745,265.962 h1.52
  text "-" at 311.2,265.962 h1.52
  text "F" at -5.019,265.708 h1.69
  text "11" at 8.569,262.152 h1.52
  text "2.000mm (78.74mil)" at 23.805,262.152 h1.52
  text "PTH" at 53.261,262.152 h1.52
  text "Round" at 66.11,262.152 h1.52
  text "Top Layer - Bottom Layer" at 84.749,262.152 h1.52
  text "Pad" at 122.837,262.152 h1.52
  text "Rounded" at 137.819,262.152 h1.52
  text "(Mixed)" at 156.763,262.152 h1.52
  text "-" at 281.745,262.152 h1.52
  text "-" at 311.2,262.152 h1.52
  text "12" at 8.569,258.342 h1.52
  text "1.450mm (57.09mil)" at 23.805,258.342 h1.52
  text "PTH" at 53.261,258.342 h1.52
  text "Round" at 66.11,258.342 h1.52
  text "Top Layer - Bottom Layer" at 84.749,258.342 h1.52
  text "Pad" at 122.837,258.342 h1.52
  text "(Mixed)" at 137.819,258.342 h1.52
  text "(Mixed)" at 156.763,258.342 h1.52
  text "-" at 281.745,258.342 h1.52
  text "-" at 311.2,258.342 h1.52
  text "14" at 8.569,254.532 h1.52
  text "1.400mm (55.12mil)" at 23.805,254.532 h1.52
  text "PTH" at 53.261,254.532 h1.52
  text "Round" at 66.11,254.532 h1.52
  text "Top Layer - Bottom Layer" at 84.749,254.532 h1.52
  text "Pad" at 122.837,254.532 h1.52
  text "(Mixed)" at 137.819,254.532 h1.52
  text "(Mixed)" at 156.763,254.532 h1.52
  text "-" at 281.745,254.532 h1.52
  text "-" at 311.2,254.532 h1.52
  text "18" at 8.569,250.722 h1.52
  text "1.000mm (39.37mil)" at 23.805,250.722 h1.52
  text "PTH" at 53.261,250.722 h1.52
  text "Round" at 66.11,250.722 h1.52
  text "Top Layer - Bottom Layer" at 84.749,250.722 h1.52
  text "Pad" at 122.837,250.722 h1.52
  text "(Mixed)" at 137.819,250.722 h1.52
  text "(Mixed)" at 156.763,250.722 h1.52
  text "-" at 281.745,250.722 h1.52
  text "-" at 311.2,250.722 h1.52
  text "20" at 8.569,246.912 h1.52
  text "0.920mm (36.22mil)" at 23.805,246.912 h1.52
  text "PTH" at 53.261,246.912 h1.52
  text "Round" at 66.11,246.912 h1.52
  text "Top Layer - Bottom Layer" at 84.749,246.912 h1.52
  text "Pad" at 122.837,246.912 h1.52
  text "(Mixed)" at 137.819,246.912 h1.52
  text "(Mixed)" at 156.763,246.912 h1.52
  text "-" at 281.745,246.912 h1.52
  text "-" at 311.2,246.912 h1.52
  text "30" at 8.569,243.102 h1.52
  text "1.200mm (47.24mil)" at 23.805,243.102 h1.52
  text "PTH" at 53.261,243.102 h1.52
  text "Round" at 66.11,243.102 h1.52
  text "Top Layer - Bottom Layer" at 84.749,243.102 h1.52
  text "Pad" at 122.837,243.102 h1.52
  text "(Mixed)" at 137.819,243.102 h1.52
  text "(Mixed)" at 156.763,243.102 h1.52
  text "-" at 281.745,243.102 h1.52
  text "-" at 311.2,243.102 h1.52
  text "39" at 8.569,239.292 h1.52
  text "0.300mm (11.81mil)" at 23.805,239.292 h1.52
  text "PTH" at 53.261,239.292 h1.52
  text "Round" at 66.11,239.292 h1.52
  text "Top Layer - Bottom Layer" at 84.749,239.292 h1.52
  text "Via" at 122.837,239.292 h1.52
  text "Rounded" at 137.819,239.292 h1.52
  text "(Mixed)" at 156.763,239.292 h1.52
  text "-" at 281.745,239.292 h1.52
  text "-" at 311.2,239.292 h1.52
  text "O" at -5.019,239.038 h1.69
  text "522" at 8.569,235.482 h1.52
  text "0.500mm (19.69mil)" at 23.805,235.482 h1.52
  text "PTH" at 53.261,235.482 h1.52
  text "Round" at 66.11,235.482 h1.52
  text "Top Layer - Bottom Layer" at 84.749,235.482 h1.52
  text "Via" at 122.837,235.482 h1.52
  text "Rounded" at 137.819,235.482 h1.52
  text "(Mixed)" at 156.763,235.482 h1.52
  text "-" at 281.745,235.482 h1.52
  text "-" at 311.2,235.482 h1.52
  text "N" at -5.019,235.228 h1.69
  text "756 Total" at 8.569,231.672 h1.52
  text "Slot definitions :" at -4.28,227.99 h1.52
  text "Routed Path Length" at 21.95,227.99 h1.52
  text "= Calculated from tool start centre position to tool end centre position." at 49.958,227.99 h1.52
  text "Hole Length" at 21.95,225.45 h1.52
  text "= Routed Path Length + Tool Size = Slot length as defined in the PCB layout" at 39.548,225.45 h1.52

## Text inside footprints (layer, text, board x,y; h text height)
BR1: Top Overlay "-" at 26.046,175.186 h1.33 r270; Top Overlay "+" at 25.955,150.192 h1.33 r270
L7: Top Overlay "1" at 155.473,44.653 h1 r90
T2: Top Overlay "1" at 228.518,102.708 h1 r270
T3: Top Overlay "1" at 238.816,17.644 h1 r270
T4: Top Overlay "1" at 260.708,67.244 h1 r90